# Altium PCB PCB.PcbDoc (part 5 of 9)
Units mil, origin at the board's own origin, x right, y up, seen from the top; angles counter-clockwise.
Board outline 4330.71 x 3149.61 mil, 8 copper layers (L1_TOP, L2_GND, L3_SIG, L4_PWR, L5_PWR, L6_SIG, L7_GND, L8_BOT), stack 62.406 mil thick; 660 components, 433 nets, 2602 pads, 1254 vias.
Unrouted connection lines stored in the file: 930.
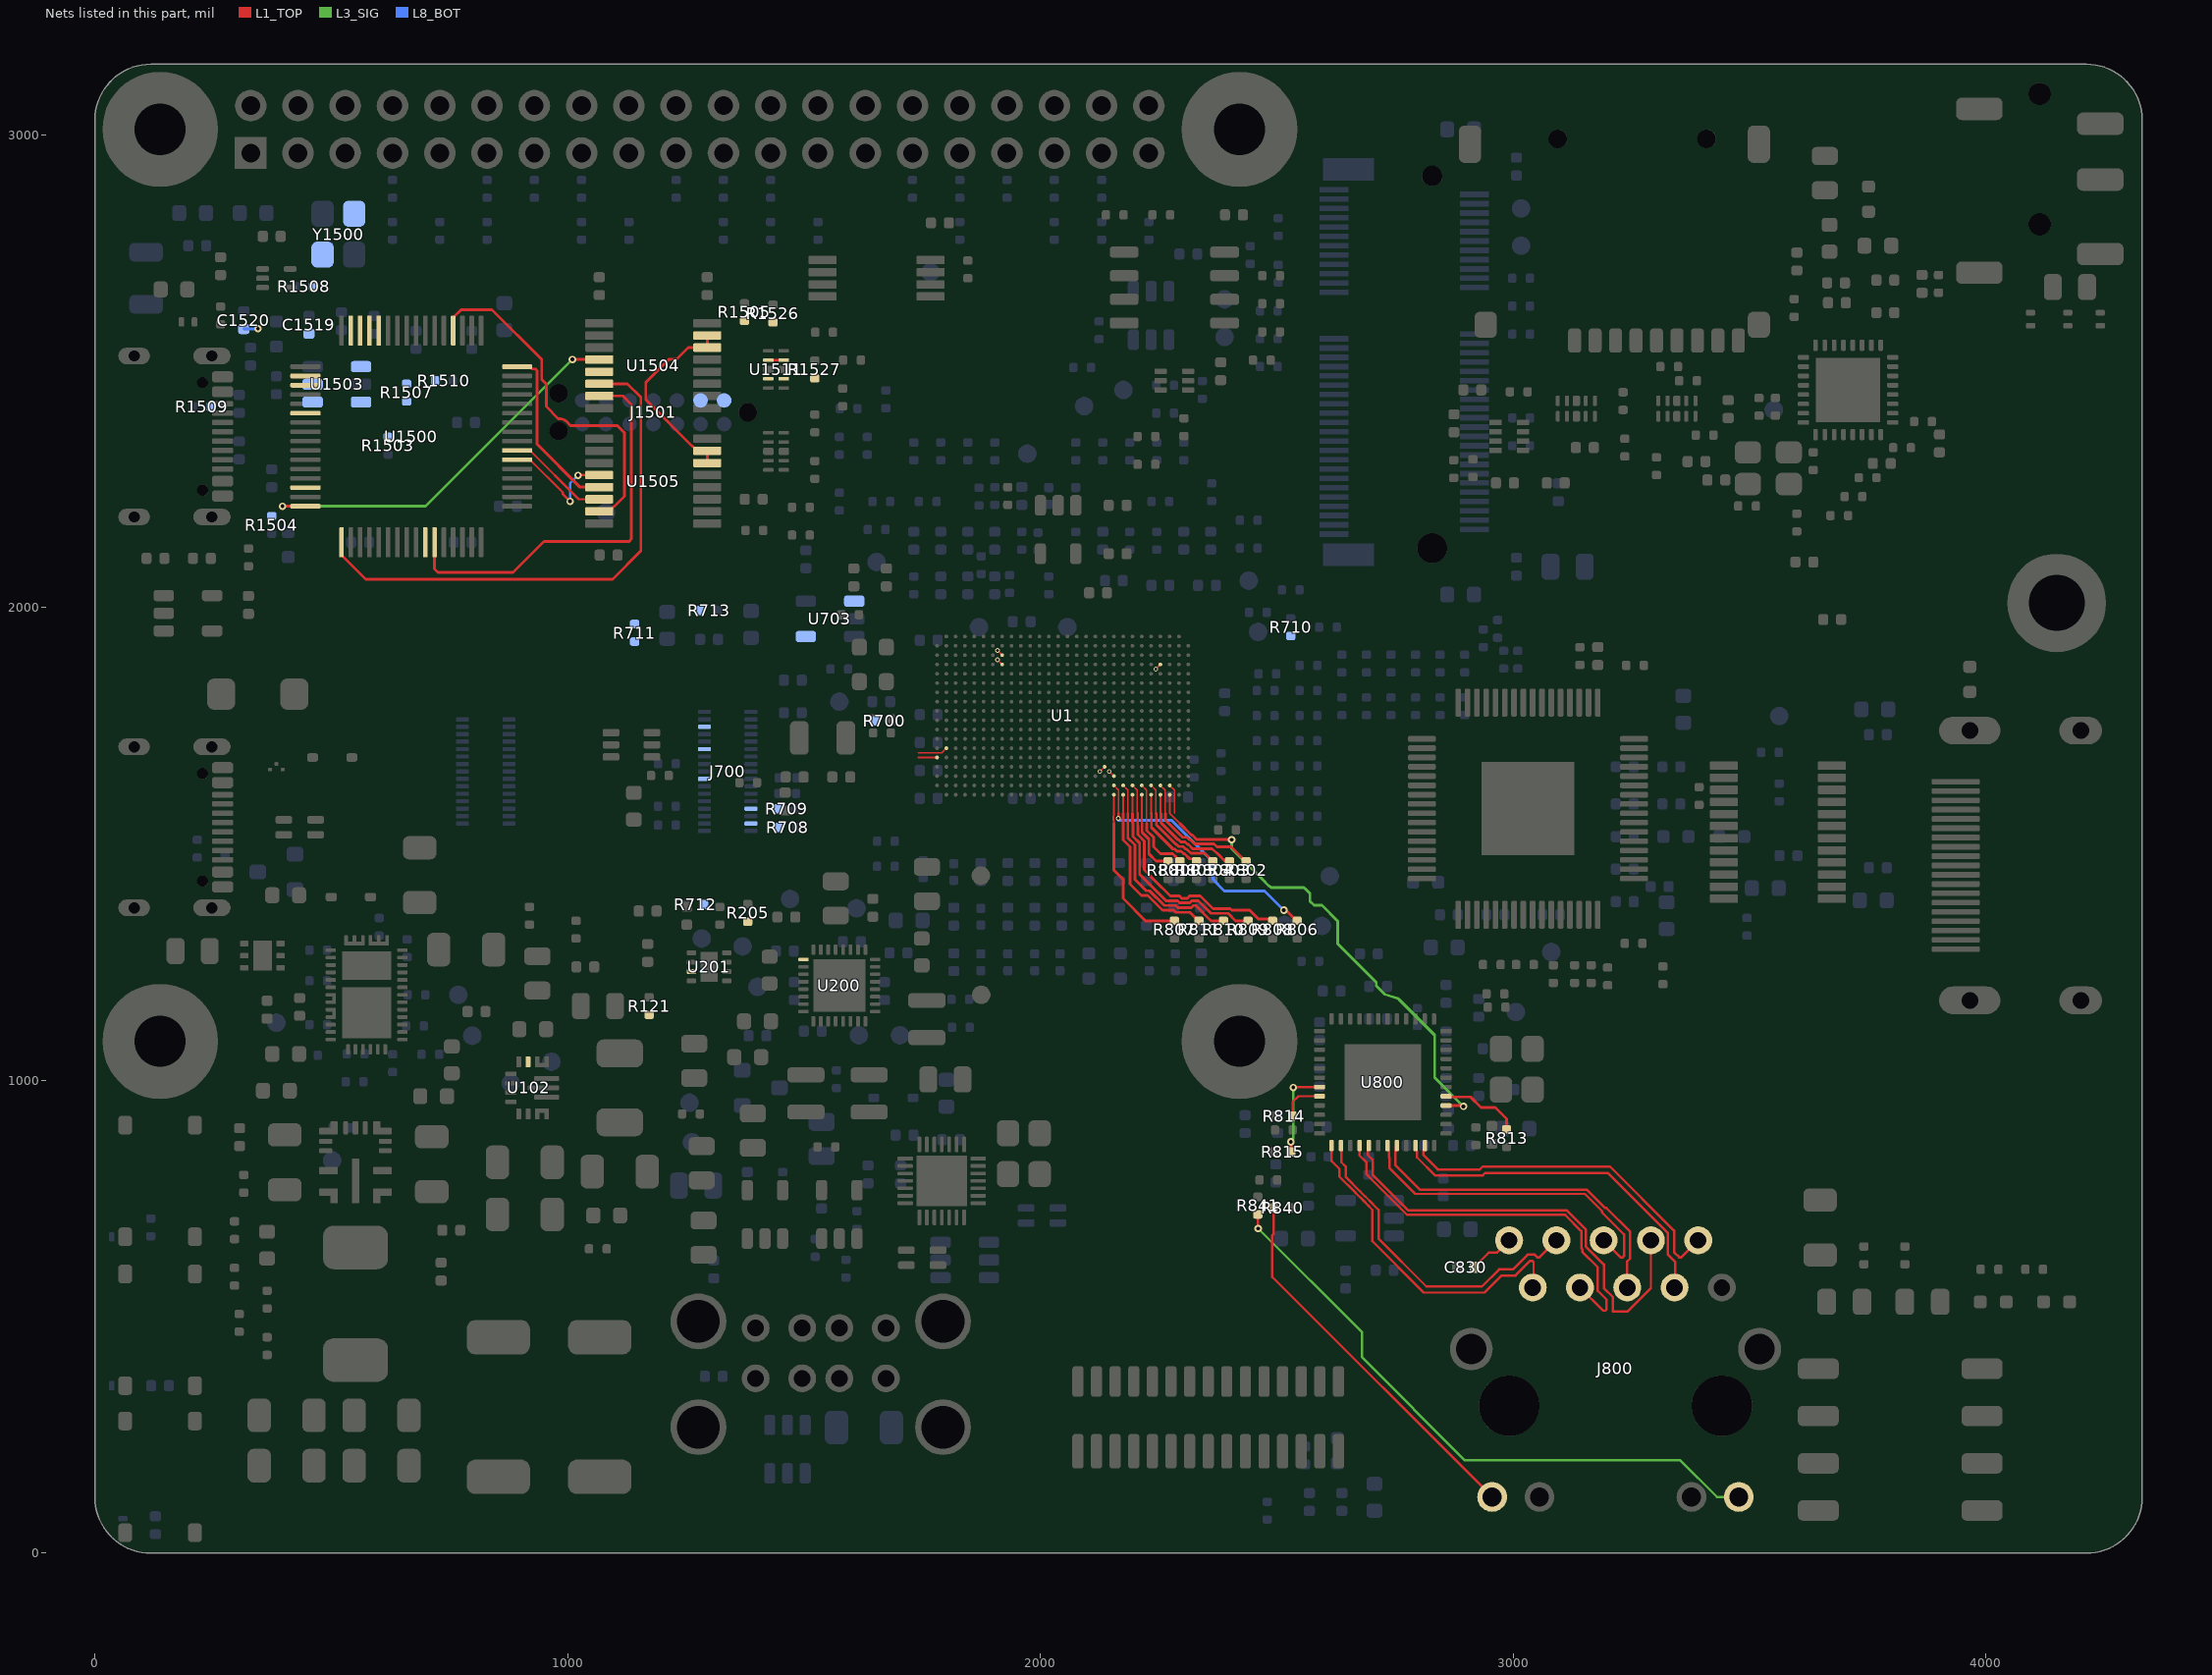
[diagram p8: the nets of this part, all layers, seen from the top]

## Via types
v1: diameter 19.68, hole 11.81, L1_TOP to L8_BOT, 865 vias
v2: diameter 9.84, hole 5.91, L1_TOP to L8_BOT, 246 vias
v3: diameter 15.75, hole 7.87, L1_TOP to L8_BOT, 125 vias
v4: diameter 13.78, hole 7.87, L1_TOP to L8_BOT, 18 vias

## Nets (pads, with @x,y where several pads share a name; then routed paths per layer and width w, separated by ;. In a path a pad name is that pad's centre, name@x,y a point inside that pad or via, vN(x,y) a via of type N, cw(c..) or ccw(c..) an arc to the next point about the centre after c; other vN are vias at no path point) (continued)
EMMC_D6: J700.33 R708.2 U1.N2 | length 63.1
  L1_TOP w3.54: 1742.13,1692.91 1791.34,1692.91 U1.N2@1801.18,1702.76
EMMC_D7: J700.31 R709.2 U1.P1 | length 39.4
  L1_TOP w3.54: 1742.13,1683.07 U1.P1@1781.5,1683.07
EMMC_GATED_RST_N: R711.1 U703.4
EMMC_MOD_CLK: J700.8 R700.2 R712.1
EMMC_MOD_DS: J700.15 R713.1
EMMC_MOD_RST_N: J700.12 R711.2
EMMC_RST_N: R710.2 U1.D25 U703.1 | length 13.9
  L1_TOP w3.54: v2(2244.09,1870.08) U1.D25@2253.94,1879.92
EMU0: J1501.13 R1526.2 U1.D8 U1511.2 U1511.9 | length 46.8
  L1_TOP w3.54: v2(1909.45,1889.76) U1.D8@1919.29,1879.92
  L1_TOP w5.91: U1511.2@1424.51,2523.62 U1511.9@1457.38,2523.62
EMU1: J1501.14 R1527.2 U1.C8 U1511.4 U1511.7 | length 13.9
  L1_TOP w3.54: v2(1909.45,1909.45) U1.C8@1919.29,1899.61
EN_3V3_SYS: R205.2 U200.17 U201.3
EN_5V0: R121.2 U102.14
ETH_LED_GRN: J800.11 R840.2 | length 805
  L1_TOP w5.12: R840.2@2493.11,730.32 2493.11,674.48 2490.75,672.12 2490.75,583.86 J800.11@2955.71,118.9
ETH_LED_YEL: J800.14 R841.2 | length 1312.7
  L1_TOP w5.12: R841.2@2460,716.3 2460,687.38 v3(2460.71,686.67)
  L3_SIG w5.12: v3(2460.71,686.67) 2680.53,466.84 2680.53,414.09 2898.33,196.3 3353.69,196.3 3431.09,118.9 J800.14@3477.36,118.9
ETH_MDC: U1.V26 U800.16 | length 1058.3
  L1_TOP w3.54: U1.V26@2273.62,1604.33 2273.62,1564.96 2295.28,1543.31
  L1_TOP w5.91: 2295.28,1543.31 2319.63,1518.96 2321.47,1518.96 2330.42,1510 2403.71,1510 v3(2404.71,1509) ; U800.16@2858.27,946.85 2893.15,946.85 v3(2895,945)
  L3_SIG w5.91: v3(2404.71,1509) 2404.71,1490.29 2469.8,1425.2 2483.68,1411.32 2488.3,1408.22 2557.66,1408.22 2559.39,1406.49 2570.24,1395.64 2570.24,1378.88 2578.88,1370.24 2595.64,1370.24 2629.2,1336.68 2629.2,1288.87 2710.43,1207.64 2710.43,1202.6 2710.43,1200.16 2728.5,1182.09 2756.56,1173.44 2758.29,1171.71 2834.01,1095.99 2834.01,1005.99 v3(2895,945)
ETH_MDI0_N: J800.3 U800.2 | length 693
  L1_TOP w5.12: U800.2@2635.83,862.2 2636.83,861.2 2636.83,826.83 2645.67,817.99 2645.67,796.14 2676.31,765.49 2676.31,765.21 2687.41,754.12 2687.68,754.12 2702.84,738.97 2702.84,738.69 2715.27,726.26 2715.27,665.48 2816.47,564.28 2934.28,564.28 2970.36,600.36 2999.53,600.36 3030.66,631.5 3045.77,631.5 3051.38,625.89 3055.62,625.89 J800.3@3091.53,661.81
ETH_MDI0_P: J800.2 U800.1 | length 707.6
  L1_TOP w5.12: U800.1@2616.14,862.2 2616.14,828.97 2632.55,812.56 2632.55,796.45 2667.26,761.74 2667.26,761.46 2683.66,745.07 2683.93,745.07 2693.78,735.22 2693.78,734.63 2702.15,726.26 2702.15,660.04 2811.04,551.16 2939.71,551.16 2975.79,587.24 3004.96,587.24 3036.1,618.38 3040.34,618.38 3043.34,615.38 3043.34,563.61 J800.2@3041.53,561.81
ETH_MDI1_N: J800.7 U800.5 | length 965.2
  L1_TOP w5.12: U800.5@2694.88,862.2 2692.85,860.17 2692.85,842.15 2703,832 2703,800.44 2778.65,724.79 2908.54,724.79 3113.77,724.79 3153.48,685.08 3153.48,648.92 3191.86,610.54 3191.86,560.54 3210.95,541.45 3210.95,510.95 3241.62,510.95 3291.53,560.87 J800.7@3291.53,661.81
ETH_MDI1_P: J800.4 U800.4 | length 837.2
  L1_TOP w5.12: U800.4@2675.2,862.2 2675.2,841.25 2689.88,826.57 2689.88,801.59 2694.34,797.14 2694.34,796.86 2775.45,715.74 2904.79,715.74 3110.02,715.74 3144.42,681.33 3144.42,644.86 3146.77,642.52 3146.77,638.15 3146.24,637.61 3178.74,605.11 3178.74,555.11 3197.83,536.02 3197.83,515.75 3194.83,512.75 3190.59,512.75 J800.4@3141.53,561.81
ETH_MDI2_N: J800.6 U800.8 | length 719.2
  L1_TOP w5.12: U800.8@2753.94,862.2 2751.77,860.04 2751.77,851.07 2750.65,849.95 2750.65,842.72 2751.23,842.14 2751.23,820.42 2792.13,779.53 2802.69,768.97 2860.23,768.97 2926.83,768.97 3155.6,768.97 3194.56,730 3197.44,730 3247.81,679.62 3247.81,623.46 3240.97,616.62 3240.97,562.38 J800.6@3241.53,561.81
ETH_MDI2_P: J800.5 U800.7 | length 710
  L1_TOP w5.12: U800.7@2734.25,862.2 2736.42,860.04 2736.42,851.07 2737.53,849.95 2737.53,837.28 2738.12,836.7 2738.12,814.99 2773.58,779.53 2793.19,759.91 2863.99,759.91 2923.08,759.91 3151.85,759.91 3188.16,723.6 3188.16,720.72 3234.69,674.19 3234.69,628.89 3231.69,625.89 3227.45,625.89 J800.5@3191.53,661.81
ETH_MDI3_N: J800.9 U800.11 | length 738.9
  L1_TOP w5.12: U800.11@2812.99,862.2 2810.83,860.04 2810.83,851.07 2809.71,849.95 2809.71,842.72 2840.68,811.74 2929.62,811.74 2935.51,817.64 2940.94,817.64 3205.2,817.64 3340.68,682.17 3340.68,636.59 3351.38,625.89 3355.62,625.89 J800.9@3391.53,661.81
ETH_MDI3_P: J800.8 U800.10 | length 750.8
  L1_TOP w5.12: U800.10@2793.31,862.2 2795.47,860.04 2795.47,851.07 2796.59,849.95 2796.59,837.28 2835.25,798.63 2935.05,798.63 2940.94,804.52 3199.77,804.52 3327.56,676.73 3327.56,631.16 3343.34,615.38 3343.34,563.61 J800.8@3341.53,561.81
ETH_MDI_CT: C830.1 J800.1 | length 96.9
  L1_TOP w5.12: C830.1@2918.9,605 2918.9,606.18 2948.19,635.48 2965.2,635.48 J800.1@2991.53,661.81
ETH_MDIO: R813.2 U1.U26 U800.17 | length 232.9
  L1_TOP w3.54: U1.U26@2273.62,1624.02 2283.46,1614.17 2283.55,1614.08 2283.55,1565.05
  L1_TOP w5.91: U800.17@2858.27,966.54 2859.8,965 2910,965 2932.5,942.5 2962.5,942.5 2986.22,918.78 R813.2@2986.22,896.65
ETH_PHY_INT_N: R814.2 U1.T20 U800.44 | length 105.4
  L1_TOP w3.54: v2(2145.67,1653.54) U1.T20@2155.51,1643.7
  L1_TOP w5.12: R814.2@2533.7,925 2533.7,954.72 2545.52,966.54 U800.44@2590.55,966.54
ETH_PHY_RST_N: R815.2 U1.R19 U800.43 | length 208.8
  L1_TOP w3.54: v2(2125.98,1653.54) U1.R19@2135.83,1663.39
  L1_TOP w5.91: v3(2530,870) 2530.26,869.74 2530.26,848.68 R815.2@2530.51,848.42 ; v3(2535,985) 2535.61,985.61 2589.94,985.61 U800.43@2590.55,986.22
  L3_SIG w5.91: v3(2530,870) 2530,872.66 2535,877.66 v3(2535,985)
ETH_RD0: R808.2 U1.U22 | length 508.8
  L1_TOP w3.54: U1.U22@2194.88,1624.02 2204.72,1614.17 2204.72,1564.96
  L1_TOP w5.91: 2205.78,1539.4 2205.78,1543.31 2205.91,1543.43 2205.91,1564.96
  L1_TOP w5.94: 2205.76,1539.38 2206.12,1539.02 2206.12,1519.75 2219.75,1506.12 2219.75,1445.25 2239.8,1425.2 2275,1390 2294.1,1390 2298.88,1385.22 2311.12,1385.22 2315.9,1390 2338.36,1390 2365.12,1363.24 2401.6,1363.24 2404.6,1360.25 2442.6,1360.25 2461.24,1341.61 2487.33,1341.61 R808.2@2491.34,1337.6
ETH_RD1: R809.2 U1.V22 | length 449.3
  L1_TOP w3.54: 2194.88,1564.96 U1.V22@2194.88,1604.33
  L1_TOP w4.87: 2195.92,1543.31 2196.46,1543.31
  L1_TOP w5.91: 2194.88,1564.96 2194.88,1544.88 2196.46,1543.31
  L1_TOP w5.94: 2195.89,1543.27 2195.89,1516.02 2209.88,1502.03 2209.88,1436.15 2220.84,1425.2 2266.03,1380 2290.13,1380 2294.79,1375.34 2315.21,1375.34 2319.87,1380 2334.39,1380 2361.03,1353.36 2397.51,1353.36 2413.28,1337.6 R809.2@2439.37,1337.6
ETH_RD2: R810.2 U1.U21 | length 436.7
  L1_TOP w3.54: U1.U21@2175.2,1624.02 2185.04,1614.17 2185.04,1564.96
  L1_TOP w5.91: 2185.07,1543.31 2185.07,1564.93
  L1_TOP w5.94: 2185.07,1543.31 2185.07,1512.86 2200,1497.94 2200,1425.2 2200,1425 2223.83,1401.17 2230.89,1401.17 2262.06,1370 2286.16,1370 2290.7,1365.47 2319.3,1365.47 2323.84,1370 2328.91,1370 2361.31,1337.6 R810.2@2387.4,1337.6
ETH_RD3: R811.2 U1.V21 | length 373
  L1_TOP w3.54: 2175.2,1564.96 U1.V21@2175.2,1604.33
  L1_TOP w5.91: 2175.2,1543.31 2175.2,1564.96
  L1_TOP w5.94: 2175.2,1543.31 2175.2,1508.77 2190,1493.97 2190,1425.2 2190,1415 2213.71,1391.29 2226.8,1391.29 2258.1,1360 2282.19,1360 2286.6,1355.59 2316.46,1355.59 2334.45,1337.6 R811.2@2335.43,1337.6
ETH_RX_CTL: R807.2 U1.V20 | length 356.4
  L1_TOP w3.54: 2155.51,1543.31 2155.51,1549.19 2154.41,1550.29 2154.41,1558.77 2155.51,1559.87 U1.V20@2155.51,1604.33
  L1_TOP w5.94: 2155.51,1543.31 2155.51,1444.69 2175,1425.2 2175,1385 2222.4,1337.6 R807.2@2283.47,1337.6
ETH_RXC: R806.2 U1.U20 | length 566.8
  L1_TOP w3.54: U1.U20@2155.51,1624.02 2165.35,1614.17 2165.35,1564.96
  L1_TOP w5.91: v2(2164.65,1554.53) 2165.35,1555.24 2165.35,1564.96
  L1_TOP w5.94: v3(2514.99,1360.19) 2516.87,1358.31 2521.61,1358.31 2542.32,1337.6 R806.2@2543.31,1337.6
  L8_BOT w5.91: v2(2164.65,1554.53) 2165,1554.18 2165,1550 2277.52,1550 2284.21,1543.31
  L8_BOT w5.94: 2284.21,1543.31 2365,1462.52 2365,1425 2389.39,1400.61 2474.57,1400.61 v3(2514.99,1360.19)
ETH_TD0: R802.1 U1.U25 | length 284
  L1_TOP w3.54: U1.U25@2253.94,1624.02 2263.78,1614.17 2263.78,1564.96
  L1_TOP w5.91: 2264.57,1564.96 2264.57,1550.43 2271.69,1543.31
  L1_TOP w5.94: 2271.69,1543.31 2296.01,1518.99 2296.46,1518.99 2301.07,1514.38 2310.26,1514.38 2315.54,1509.1 2317.38,1509.1 2326.34,1500.14 2367.53,1500.14 2373.45,1494.22 2403.5,1494.22 2434.02,1463.7 R802.1@2435,1463.7
ETH_TD1: R803.1 U1.V25 | length 238.5
  L1_TOP w3.54: 2253.94,1564.96 U1.V25@2253.94,1604.33
  L1_TOP w5.91: 2255.12,1564.96 2255.12,1544.88 2256.69,1543.31
  L1_TOP w5.94: 2256.69,1543.31 2290.9,1509.1 2292.38,1509.1 2296.98,1504.5 2306.17,1504.5 2311.45,1499.22 2313.29,1499.22 2322.25,1490.26 2363.44,1490.26 2374.23,1479.47 2375.11,1479.47 2381.75,1472.83 2381.75,1471.95 2390,1463.7 R803.1@2400,1463.7
ETH_TD2: R804.1 U1.U24 | length 239.3
  L1_TOP w3.54: U1.U24@2234.25,1624.02 2244.09,1614.17 2244.09,1564.96
  L1_TOP w5.91: 2244.45,1564.96 2245.26,1564.15 2245.26,1543.31
  L1_TOP w5.94: 2245.26,1543.31 2245.26,1540.77 2286.81,1499.22 2288.29,1499.22 2292.89,1494.63 2302.08,1494.63 2307.36,1489.34 2309.2,1489.34 2318.16,1480.39 2347.33,1480.39 2364.02,1463.7 R804.1@2365,1463.7
ETH_TD3: R805.1 U1.V24 | length 194.2
  L1_TOP w3.54: 2234.25,1564.96 U1.V24@2234.25,1604.33
  L1_TOP w5.91: 2234.25,1564.96 2235,1564.21 2235,1543.31
  L1_TOP w5.94: 2235,1543.31 2235,1535 2280.66,1489.34 2284.2,1489.34 2288.79,1484.75 2297.99,1484.75 2303.27,1479.47 2305.11,1479.47 2315.89,1468.69 2325.01,1468.69 R805.1@2330,1463.7
ETH_TX_CTL: R801.1 U1.V23 | length 178.2
  L1_TOP w3.54: U1.V23@2214.57,1604.33 2214.57,1543.99 2215.25,1543.31
  L1_TOP w5.15: 2215.25,1543.31 2215.64,1542.91 2215.64,1524.2 2216.21,1523.63
  L1_TOP w5.94: 2216.21,1523.63 2229.63,1510.21 2229.63,1479.07 2245,1463.7 R801.1@2270,1463.7
ETH_TXC: R800.1 U1.U23 | length 208.9
  L1_TOP w3.54: U1.U23@2214.57,1624.02 2224.44,1614.14 2224.44,1543.99 2225.12,1543.31
  L1_TOP w5.94: 2225.12,1543.31 2225.12,1528.69 2239.51,1514.3 2239.51,1494.19 2254.23,1479.47 2280.11,1479.47 2286.75,1472.83 2286.75,1471.76 2294.81,1463.7 R800.1@2295,1463.7
FT_EECLK: R1509.2 U1500.62 U1503.4
FT_EECS: R1508.2 U1500.63 U1503.5
FT_EEDATA: R1507.2 U1500.61 U1503.3
FT_EEDO: R1507.1 R1510.2 U1503.1
FT_OSCI: C1519.1 U1500.2 Y1500.1
FT_OSCO: C1520.1 U1500.3 Y1500.3 | length 30.3
  L8_BOT w5.94: C1520.1@314.96,2589.37 315.28,2589.69 344.69,2589.69 v3(345,2590)
FT_PWREN_N: R1505.2 U1500.60 U1504.14 U1504.15 U1505.14 U1505.15 | length 423.1
  L1_TOP w5.91: U1505.14@1295.28,2306.1 U1505.15@1295.28,2331.69 1274.61,2331.69 1264.76,2341.54 1263.46,2341.54 1165.24,2439.76 1165.24,2476.12 1214.12,2525 1230,2525 1255.2,2550.2 U1504.14@1295.28,2550.2 U1504.15@1295.28,2575.79
FT_REF: R1503.1 U1500.6
FT_RESET_N: R1504.2 U1500.14
FTA_RXD: U1500.17 U1504.6 | length 1131.3
  L1_TOP w5.91: U1500.17@521.65,2138.29 521.65,2111.22 572.87,2060 1095,2060 1155,2120 1155,2445 1126.57,2473.43 U1504.6@1066.93,2473.43
FTA_TXD: U1500.16 U1504.4 | length 847.1
  L1_TOP w5.94: v3(396.98,2214.52) U1500.16@445.35,2214.55 ; v3(1010,2525) 1066.54,2525 U1504.4@1066.93,2524.61
  L3_SIG w5.94: v3(396.98,2214.52) 699.52,2214.52 v3(1010,2525)
FTB_RXD: U1500.27 U1504.7 | length 866
  L1_TOP w5.91: U1500.27@718.5,2138.29 718.5,2081.5 725.71,2074.29 884.29,2074.29 950,2140 1130,2140 1135,2145 1135,2430 1117.17,2447.83 U1504.7@1066.93,2447.83
FTB_TXD: U1500.26 U1504.5
FTC_RXD: U1500.39 U1505.6 | length 216.5
  L1_TOP w5.12: U1500.39@893.21,2332.68 920.28,2332.68 1023.62,2229.33 U1505.6@1066.93,2229.33
FTC_TXD: U1500.38 U1505.4 | length 257.4
  L1_TOP w5.12: U1500.38@893.21,2312.99 920.28,2312.99 990,2243.27 990,2240 v3(1005,2225) ; v3(1022,2280.08) 1022.21,2280.3 1066.71,2280.3 U1505.4@1066.93,2280.51
  L8_BOT w5.12: v3(1005,2225) 1005,2263.08 v3(1022,2280.08)
FTD_RXD: U1500.52 U1505.7 | length 756.4
  L1_TOP w5.91: U1500.52@757.87,2586.12 757.87,2613.19 774.68,2630 840,2630 945,2525 945,2482.48 954.72,2472.75 954.72,2425.28 980.25,2399.75 cw(c981.1,2373.39) 1003.29,2387.65 ccw(c1008.22,2390.91) 1005.52,2385.65 1006.79,2385 1008.22,2385 1105,2385 1120,2370 1120,2235.41 1098.17,2213.58 1097.44,2213.58 1087.6,2203.74 U1505.7@1066.93,2203.74
FTD_TXD: U1500.48 U1505.5 | length 358.6
  L1_TOP w5.94: U1500.48@905,2510 920,2510 925,2505 931.52,2505 935,2501.52 935,2346.17 1026.25,2254.92 U1505.5@1066.93,2254.92